# Altium PCB PCB_Adaptor_Board-v2.0.PcbDoc (part 3 of 3)
Units mm, origin at the board's own origin, x right, y up, seen from the top; angles counter-clockwise.
Board outline 135 x 88.7 mm, 2 copper layers (Top Layer, Bottom Layer), stack 1.57 mm thick; 43 components, 95 nets, 382 pads, 142 vias.
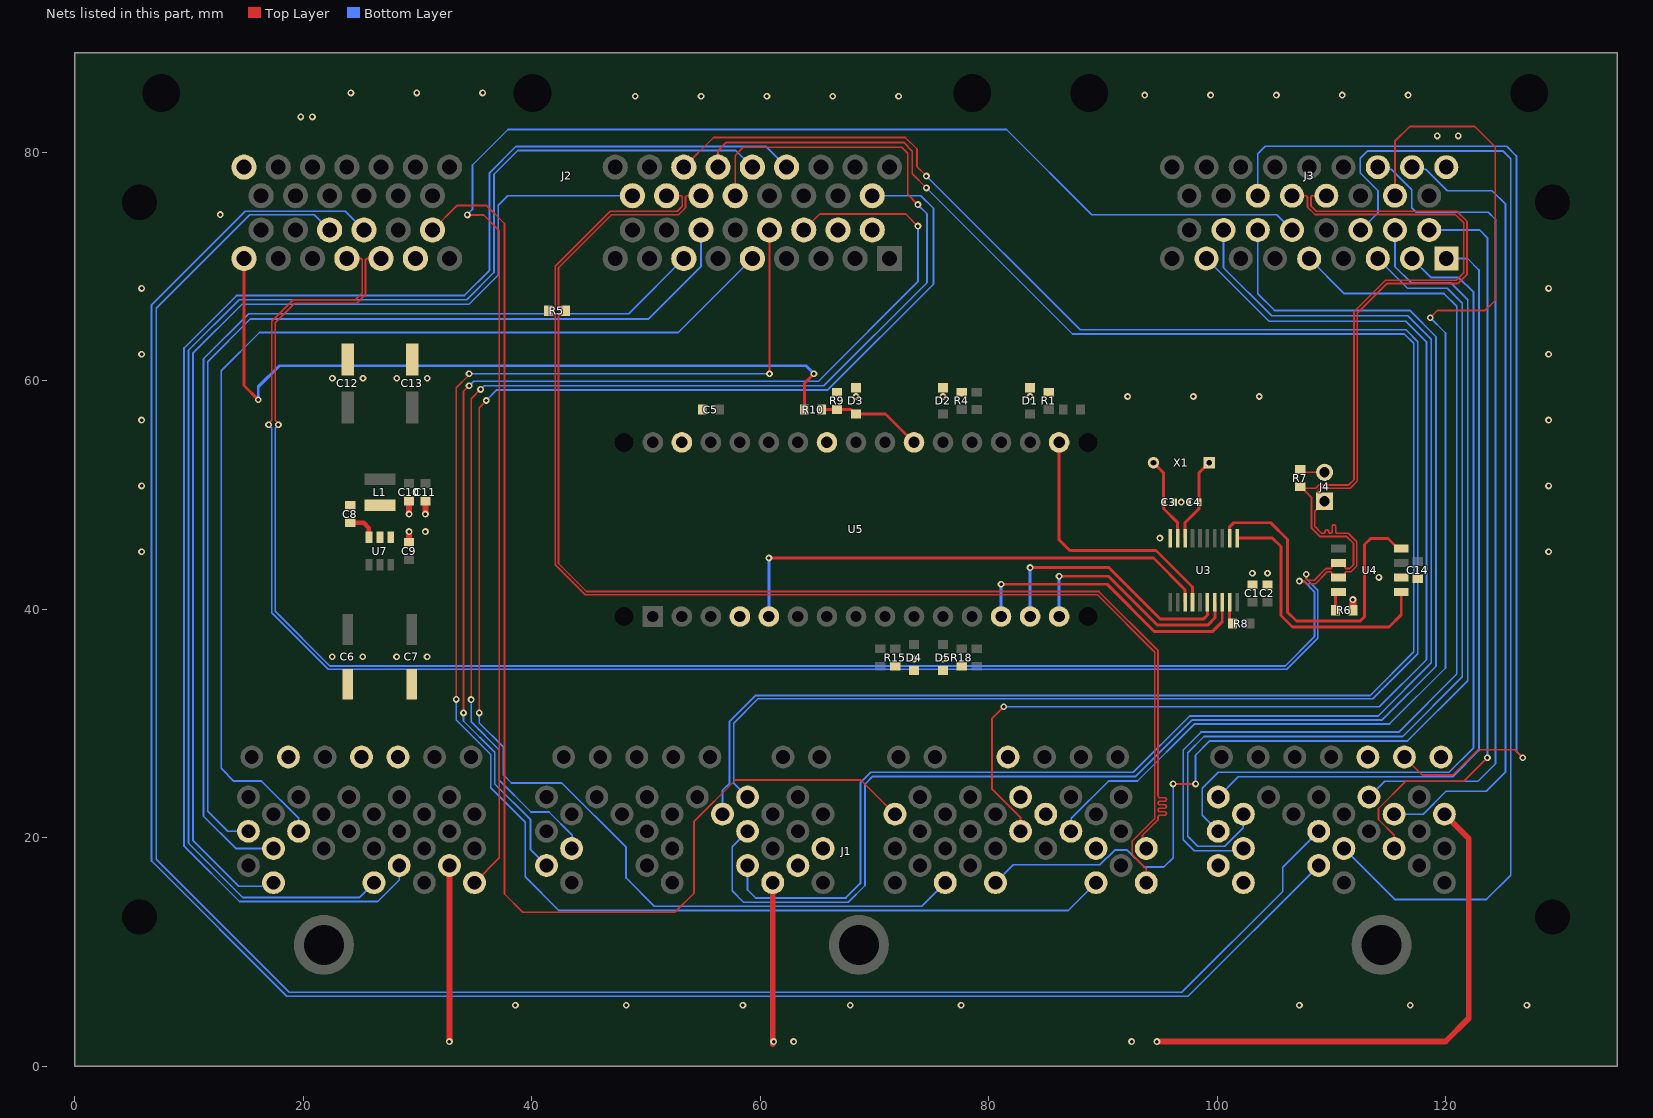
[diagram p2: the nets of this part, all layers, seen from the top]

## Via types
v1: diameter 0.6, hole 0.3, Top Layer to Bottom Layer, 142 vias

## Nets (pads, with @x,y where several pads share a name; then routed paths per layer and width w, separated by ;. In a path a pad name is that pad's centre, name@x,y a point inside that pad or via, vN(x,y) a via of type N, cw(c..) or ccw(c..) an arc to the next point about the centre after c; other vN are vias at no path point) (continued)
A25/A5: J1.A25 J2.A5 | length 95.1
  Bottom Layer w0.152: J1.A25@19.585,20.567 19.585,21.712 16.337,24.96 13.909,24.96 12.799,26.07 12.799,60.874 16.153,64.229 52.824,64.229 J2.A5@59.301,70.706
A26/A7: J1.A26 J2.A7 | length 93
  Bottom Layer w0.152: J1.A26@17.385,19.067 14.092,19.067 11.248,21.91 11.248,61.91 15.212,65.874 48.47,65.874 J2.A7@53.301,70.706
A27/A15: J1.A27 J2.A15 | length 93.5
  Bottom Layer w0.152: J1.A27@15.185,20.567 13.385,20.567 11.636,22.316 11.636,61.687 15.371,65.423 50.226,65.423 54.801,69.998 J2.A15@54.801,73.206
A28/B14: J1.A28 J3.B14 | length 142.6
  Top Layer w0.152: v1(34.351,74.522) 35.788,74.522 37.156,73.154 37.156,18.238 J1.A28@34.985,16.067
  Bottom Layer w0.152: v1(34.351,74.522) 34.351,74.548 34.807,75.005 34.807,78.893 37.913,81.999 81.552,81.999 89.016,74.535 105.222,74.535 J3.B14@106.551,73.206
A31/A29: J1.A31 J2.A29 | length 132.3
  Bottom Layer w0.152: J1.A31@28.385,17.567 28.385,16.305 26.498,14.418 14.407,14.418 9.557,19.267 9.557,62.875 14.154,67.472 34.093,67.472 36.301,69.679 36.301,78.213 38.611,80.523 60.483,80.523 J2.A29@62.301,78.706
A32/A30: J1.A32 J2.A30 | length 124.1
  Bottom Layer w0.152: J1.A32@26.185,16.067 24.883,14.765 14.715,14.765 9.933,19.547 9.933,62.652 14.37,67.09 34.285,67.09 36.678,69.482 36.678,78.067 38.775,80.164 57.843,80.164 J2.A30@59.301,78.706
A33/A25: J1.A33 J2.A25 | length 99.2
  Bottom Layer w0.152: J1.A33@17.385,16.067 17.07,15.752 14.346,15.752 10.33,19.767 10.33,62.416 14.622,66.708 34.501,66.708 37.061,69.268 37.061,75.362 37.904,76.206 J2.A25@48.801,76.206
AGND: J1.A29 J1.B29 J1.B30 J1.C10 J1.C11 J1.C19 J1.D8 J1.D30 J1.D31 J2.C26 J3.B26 | length 76.8
  Top Layer w0.508: v1(32.785,2.159) J1.A29@32.785,17.567 ; v1@61.085,1.933 61.085,2.159 J1.B30@61.085,16.067 ; J1.B29@63.011,17.293 J1.B29@63.285,17.567 ; v1(94.719,2.159) 119.977,2.159 122.022,4.203 122.022,19.93 J1.D8@119.885,22.067
  other v1: 61.163,2.159 62.916,2.159 92.498,2.159 119.261,81.438 121.101,81.438 19.768,83.101 20.781,83.101
B11/A32: J1.B11 J2.A32 | length 170.3
  Top Layer w0.152: J2.A32@53.301,78.706 55.899,81.304 72.699,81.304 73.712,80.291 73.712,78.758 v1(74.542,77.928)
  Bottom Layer w0.152: J1.B11@58.885,23.567 57.673,24.778 57.673,30.038 59.8,32.165 113.607,32.165 117.561,36.12 117.561,63.428 116.527,64.463 88.007,64.463 v1@74.543,77.927
B12/A31: J1.B12 J2.A31 | length 168.9
  Top Layer w0.152: J2.A31@56.301,78.706 56.301,80.15 57.023,80.872 72.544,80.872 73.304,80.111 73.304,78.123 v1(74.542,76.885)
  Bottom Layer w0.152: J1.B12@56.685,22.067 56.685,24.147 57.308,24.77 57.308,30.19 59.563,32.445 113.369,32.445 117.196,36.271 117.196,63.276 116.375,64.097 87.33,64.097 v1(74.542,76.885)
B23/B15: J1.B23 J3.B15 | length 133.1
  Bottom Layer w0.152: J1.B23@58.885,20.567 57.531,19.213 57.531,15.349 58.523,14.357 67.694,14.357 69.16,15.823 69.16,24.684 69.848,25.371 92.862,25.371 97.807,30.317 114.447,30.317 119.152,35.022 119.152,63.867 116.851,66.167 105.013,66.167 103.551,67.629 J3.B15@103.551,73.206
B26/A22: J1.B26 J2.A22 | length 119.3
  Top Layer w0.152: v1(34.685,32.097) 34.685,58.43 v1(35.507,59.252) ; J2.A22@57.801,76.206 57.801,79.726 58.516,80.442 72.382,80.442 72.895,79.929 72.895,76.328 v1(73.795,75.428)
  Bottom Layer w0.152: v1(34.685,32.097) 34.685,30.142 37.145,27.682 37.145,25.03 39.924,22.251 41.497,22.251 43.542,20.206 43.542,19.124 J1.B26@43.485,19.067 ; v1(35.507,59.252) 35.828,59.573 65.564,59.573 74.59,68.599 74.59,74.633 v1(73.795,75.428)
B31/B16: J1.B31 J3.B16 | length 128.4
  Bottom Layer w0.152: J1.B31@58.885,17.567 58.885,15.428 59.578,14.735 67.494,14.735 68.763,16.004 68.763,24.83 69.67,25.737 92.658,25.737 97.586,30.665 114.091,30.665 118.733,35.307 118.733,63.629 116.667,65.695 104.757,65.695 100.551,69.902 J3.B16@100.551,73.206
B35/A12: J1.B35 J2.A12 | length 104.2
  Top Layer w0.152: v1(34.015,30.927) 34.015,59.087 v1(34.501,59.573) ; J2.A12@63.801,73.206 65.197,74.601 72.737,74.601 v1(73.795,73.544)
  Bottom Layer w0.152: v1(34.015,30.927) 34.015,30.219 36.757,27.478 36.757,24.711 39.889,21.579 39.889,18.962 J1.B35@41.285,17.567 ; v1(34.501,59.573) 34.523,59.573 34.923,59.972 65.093,59.972 73.795,68.675 v1(73.795,73.544)
C16/C8: J1.C16 J2.C8 | length 111.1
  Top Layer w0.152: J2.C8@31.301,73.206 33.453,75.358 36.021,75.358 37.608,73.771 37.608,15.074 39.195,13.487 52.518,13.487 54.201,15.169 54.201,21.43 57.823,25.053 68.799,25.053 J1.C16@71.785,22.067
C20/B19: J1.C20 J3.B19 | length 105.2
  Top Layer w0.152: J3.B19@115.551,76.206 115.551,80.975 116.845,82.269 122.534,82.269 124.332,80.471 124.332,67.038 123.461,66.167 119.282,66.167 v1(118.641,65.526)
  Bottom Layer w0.152: J1.C20@87.185,20.567 87.23,20.611 87.23,21.706 90.489,24.966 93.016,24.966 98.019,29.969 115.082,29.969 119.976,34.863 119.976,64.191 v1(118.641,65.526)
C22/B8: J1.C22 J3.B8 | length 101.2
  Top Layer w0.152: v1(81.305,31.471) 80.289,30.455 80.289,24.256 82.785,21.761 J1.C22@82.785,20.567
  Bottom Layer w0.152: v1(81.305,31.471) 114.189,31.471 118.325,35.607 118.325,63.392 116.494,65.223 104.533,65.223 J3.B8@99.051,70.706
C30/A13: J1.C30 J2.A13 | length 138
  Top Layer w0.152: v1(33.376,32.111) 33.376,59.39 v1@34.501,60.515 ; v1(60.801,60.621) J2.A13@60.801,73.206
  Bottom Layer w0.152: v1(33.376,32.111) 33.376,30.313 36.396,27.292 36.396,24.387 39.418,21.366 39.418,16.583 42.363,13.637 86.955,13.637 J1.C30@89.385,16.067 ; v1(34.501,60.621) v1(60.801,60.621)
C31/B11: J1.C31 J3.B11 | length 99.3
  Top Layer w0.152: v1(96.139,24.714) 96.141,24.716 98.098,24.716 v1(98.1,24.719)
  Bottom Layer w0.152: J1.C31@80.585,16.067 82.15,17.632 89.729,17.632 91.016,18.919 92.111,18.919 93.593,17.437 95.308,17.437 96.139,18.267 v1(96.139,24.714) ; v1(98.1,24.719) 98.1,27.231 99.349,28.48 116.651,28.48 121.924,33.752 121.924,67.105 120.438,68.591 116.969,68.591 115.551,70.009 J3.B11@115.551,73.206
C33/A18: J1.C33 J2.A18 | length 135.6
  Top Layer w0.152: v1(35.392,30.927) 35.392,57.656 v1(36.012,58.276)
  Bottom Layer w0.152: v1(35.392,30.927) 35.392,30.051 37.523,27.92 37.523,25.491 38.218,24.795 42.617,24.795 48.247,19.165 48.247,16.483 50.726,14.005 74.123,14.005 J1.C33@76.185,16.067 ; v1(36.012,58.276) 36.942,59.206 65.904,59.206 75.156,68.458 75.156,75.102 74.052,76.206 J2.A18@69.801,76.206
CAN1_N: J2.C4 J3.B22 R7.2 U4.6 | length 207.1
  Top Layer w0.152: v1(16.96,56.159) 16.96,56.281 17.241,56.561 17.241,65.217 19.113,67.09 24.553,67.09 25.155,67.691 25.155,70.616 25.065,70.706 J2.C4@23.801,70.706 ; J3.B22@106.551,76.206 107.815,76.206 107.905,76.116 107.905,75.211 108.558,74.558 120.844,74.558 121.578,73.824 121.578,69.454 120.929,68.805 114.733,68.805 111.972,66.043 111.972,51.35 111.51,50.888 108.911,50.888 108.622,50.599 R7.2@107.453,50.599 ; R7.2@107.265,50.723 107.328,50.723 R7.2@107.453,50.599 ; v1(107.793,43.068) 107.816,43.046 107.816,42.648 107.925,42.54 108.477,42.54 109.511,43.574 109.947,43.574 110.036,43.663 110.036,43.789 110.31,44.063 U4.6@110.61,44.063 110.91,44.063 111.184,43.789 111.184,43.663 111.273,43.574 111.588,43.574 111.926,43.912 111.926,45.788 111.346,46.368 109.007,46.368 108.244,47.13 108.244,49.807 R7.2@107.453,50.599
  Bottom Layer w0.152: v1(16.96,56.159) 16.96,56.122 17.241,55.841 17.241,39.698 22.19,34.749 106.079,34.749 108.799,37.469 108.799,41.666 107.816,42.648 107.816,43.046 v1(107.793,43.068)
CAN1_P: J2.C3 J3.B21 J4.1 U4.7 | length 207.1
  Top Layer w0.152: v1(17.814,56.159) 17.814,56.281 17.533,56.561 17.533,65.096 19.234,66.798 24.674,66.798 25.447,67.57 25.447,70.616 25.536,70.706 J2.C3@26.801,70.706 ; v1(107.19,42.464) 107.212,42.442 107.61,42.442 107.804,42.248 108.598,42.248 109.632,43.282 109.947,43.282 110.036,43.193 110.036,43.067 110.31,42.793 U4.7@110.61,42.793 110.91,42.793 111.184,43.067 111.184,43.193 111.273,43.282 111.709,43.282 112.218,43.791 112.218,45.909 111.467,46.66 110.896,46.66 110.515,46.66 cw(c110.515,46.812) 110.363,46.812 110.363,47.24 ccw(c110.211,47.24) 110.058,47.24 110.058,46.812 cw(c109.906,46.812) 109.753,46.812 ccw(c109.601,46.812) 109.449,46.812 cw(c109.296,46.812) 109.296,46.66 109.127,46.66 108.613,47.174 108.536,47.251 108.536,48.592 J4.1@109.398,49.454 108.779,50.072 108.779,50.343 109.032,50.596 111.631,50.596 112.264,51.229 112.264,65.922 114.854,68.513 121.05,68.513 121.87,69.333 121.87,73.945 120.965,74.85 108.679,74.85 108.197,75.332 108.197,76.116 108.286,76.206 J3.B21@109.551,76.206
  Bottom Layer w0.152: v1(17.814,56.159) 17.814,56.122 17.533,55.841 17.533,39.819 22.311,35.041 105.958,35.041 108.507,37.59 108.507,41.545 107.61,42.442 107.212,42.442 v1(107.19,42.464)
CANHH_N: J1.C28 J2.A24 R5.2 | length 119.8
  Top Layer w0.152: J2.A24@51.801,76.206 53.065,76.206 53.155,76.116 53.155,75.282 52.716,74.843 46.855,74.843 42.043,70.031 42.043,66.231 41.954,66.142 R5.2@41.427,66.142 41.427,66.078 41.732,65.773 41.954,65.773 42.043,65.684 42.043,43.89 44.667,41.266 89.518,41.266 94.529,36.255 94.529,21.689 92.556,19.716 92.556,18.512 93.785,17.283 J1.C28@93.785,16.067
CANHH_P: J1.C17 J2.A23 R5.1 | length 119.8
  Top Layer w0.152: J2.A23@54.801,76.206 53.536,76.206 53.447,76.116 53.447,75.161 52.837,74.551 46.976,74.551 42.335,69.91 42.335,66.231 42.425,66.142 R5.1@42.951,66.142 42.951,66.078 42.647,65.773 42.425,65.773 42.335,65.684 42.335,44.011 44.788,41.558 89.639,41.558 94.821,36.376 94.821,23.966 94.821,23.652 ccw(c94.974,23.652) 94.974,23.5 95.398,23.5 cw(c95.398,23.347) 95.398,23.195 94.974,23.195 ccw(c94.974,23.042) 94.974,22.89 95.398,22.89 cw(c95.398,22.738) 95.398,22.585 94.974,22.585 ccw(c94.974,22.433) 94.974,22.28 95.398,22.28 cw(c95.398,22.128) 95.398,21.976 94.974,21.976 ccw(c94.974,21.823) 94.821,21.823 94.821,21.568 94.543,21.29 93.459,20.206 93.459,19.448 93.431,19.42 J1.C17@93.785,19.067
CS#: U3.18 U5.13 | length 26
  Top Layer w0.254: v1(81.073,42.189) 90.364,42.189 94.512,38.041 99.57,38.041 100.436,38.907 U3.18@100.436,40.628
  Bottom Layer w0.254: U5.13@81.073,39.37 v1(81.073,42.189)
D2/B23: J1.D2 J3.B23 | length 92.1
  Top Layer w0.152: J1.D2@116.385,27.067 117.952,25.499 120.626,25.499 122.831,27.704 126.042,27.704 v1(126.746,27)
  Bottom Layer w0.152: J3.B23@103.551,76.206 103.551,79.878 104.199,80.526 125.346,80.526 126.187,79.685 126.187,27.559 v1(126.746,27)
D10/B27: J1.D10 J3.B27 | length 70.5
  Bottom Layer w0.152: J1.D10@115.485,22.067 118.021,22.067 120.024,24.069 123.544,24.069 125.24,25.765 125.24,75.446 124.054,76.632 120.134,76.632 118.24,78.525 117.231,78.525 J3.B27@117.051,78.706
D11/B28: J1.D11 J3.B28 | length 73.1
  Bottom Layer w0.152: J1.D11@113.285,23.567 114.664,24.946 122.822,24.946 124.36,26.484 124.36,74.121 123.726,74.755 117.428,74.755 117.037,75.146 117.037,76.73 115.24,78.526 114.23,78.526 J3.B28@114.051,78.706
D16/B3: J1.D16 J3.B3 | length 82.9
  Bottom Layer w0.152: J1.D16@102.285,22.067 102.285,20.882 100.668,19.265 98.301,19.265 97.42,20.146 97.42,27.449 98.836,28.864 116.223,28.864 121.449,34.09 121.449,66.783 120.132,68.099 116.657,68.099 J3.B3@114.051,70.706
D17/B1: J1.D17 J3.B1 | length 69.8
  Bottom Layer w0.152: J1.D17@100.085,23.567 101.852,25.334 120.607,25.334 122.91,27.636 122.91,69.698 121.902,70.706 J3.B1@120.051,70.706
D20/B10: J1.D20 J3.B10 | length 66.3
  Top Layer w0.152: J1.D20@115.485,19.067 115.485,20.235 114.119,21.601 114.119,22.565 116.5,24.946 121.593,24.946 v1(123.647,27)
  Bottom Layer w0.152: J3.B10@118.551,73.206 122.979,73.206 123.647,72.538 v1(123.647,27)
D22/B12: J1.D22 J3.B12 | length 101.3
  Bottom Layer w0.152: J1.D22@111.085,19.067 115.548,14.603 123.569,14.603 125.69,16.724 125.69,79.437 124.998,80.129 113.184,80.129 112.527,79.472 112.527,78.192 114.068,76.651 114.068,74.723 J3.B12@112.551,73.206
D23/C11: J1.D23 J2.C11 | length 181
  Bottom Layer w0.152: J2.C11@22.301,73.206 20.966,74.541 15.309,74.541 7.12,66.351 7.12,18.124 18.775,6.469 96.908,6.469 105.738,15.299 105.738,17.42 J1.D23@108.885,20.567
D24/B5: J1.D24 J3.B5 | length 87.2
  Bottom Layer w0.152: J1.D24@102.285,19.067 102.079,18.861 97.97,18.861 97.017,19.814 97.017,27.688 98.579,29.25 115.872,29.25 120.962,34.34 120.962,66.528 119.854,67.637 111.12,67.637 J3.B5@108.051,70.706
D25/B2: J1.D25 J3.B2 | length 76
  Bottom Layer w0.152: J1.D25@100.085,20.567 98.683,21.969 98.683,24.333 100.085,25.735 120.288,25.735 122.439,27.885 122.439,67.746 121.148,69.037 118.719,69.037 J3.B2@117.051,70.706
D29/C10: J1.D29 J2.C10 | length 183.2
  Bottom Layer w0.152: J2.C10@25.301,73.206 23.651,74.855 14.918,74.855 6.708,66.645 6.708,17.966 18.553,6.122 97.44,6.122 J1.D29@108.885,17.567
D-4/C7_#A2: J2.C7 R10.1 | length 67.2
  Top Layer w0.254: J2.C7@14.801,70.706 14.801,59.595 v1(16.051,58.345) ; R10.1@63.855,57.487 63.855,59.783 v1(64.694,60.621)
  Bottom Layer w0.254: v1(16.051,58.345) 16.051,59.477 17.896,61.322 63.993,61.322 v1(64.694,60.621)
D-4/C7_A2: D3.1 R9.1 R10.2 U5.21 | length 9.4
  Top Layer w0.254: R10.2@65.227,57.487 R10.2@65.379,57.487 R9.1@66.722,57.487 67.935,57.487 68.323,57.099 D3.1@68.373,57.099 70.964,57.099 U5.21@73.453,54.61
GND: C1.1 C2.1 C3.1 C4.1 C5.2 C6.2 C7.2 C9.1 C10.1 C11.1 C12.2 C13.2 C14.1 D1.2 D2.2 D3.2 D4.2 D5.2 J1.A3 J1.A4 J1.A6 J1.B20 J1.C4 J1.D1 J1.D3 J2.A10 J2.A11 J2.C2 R1.2 R4.1 R6.2 R9.2 R15.2 R18.1 U3.10 U4.2 U5.4 U5.24 U5.29 U7.4 | length 4.2
  Top Layer w0.508: C9.1@29.25,45.862 v1(29.25,46.8) ; v1(29.25,48.336) C10.1@29.25,49.486 ; v1(30.683,48.336) C11.1@30.683,49.486
  Top Layer w0.635: R6.2@111.88,39.923 v1(111.88,40.85)
  other v1: 38.557,5.334 48.26,5.334 58.471,5.334 67.869,5.334 77.572,5.334 107.188,5.334 116.891,5.334 127.102,5.334 73.453,35.661 75.993,35.661 22.527,35.849 25.199,35.849 28.161,35.849 30.833,35.849 114.148,42.793 103.073,43.155 104.396,43.155 5.842,45.034 129.01,45.034 94.974,46.228 30.683,46.8 96.852,49.379 5.842,50.8 129.01,50.8 5.842,56.566 129.01,56.566 68.373,58.63 75.993,58.63 83.613,58.63 92.151,58.63 97.917,58.63 103.683,58.63 22.543,60.227 25.215,60.227 28.176,60.227 30.848,60.227 5.842,62.332 129.01,62.332 5.842,68.097 129.01,68.097 12.722,74.549 49.047,84.912 54.813,84.912 60.579,84.912 66.345,84.912 72.111,84.912 93.65,85.018 99.416,85.018 105.181,85.018 110.947,85.018 116.713,85.018 24.154,85.206 29.92,85.206 35.686,85.206
INT#: U3.13 U5.5 | length 43.8
  Top Layer w0.254: v1(60.753,44.491) 94.408,44.491 97.186,41.713 U3.13@97.186,40.628
  Bottom Layer w0.254: U5.5@60.753,39.37 v1(60.753,44.491)
MISO: U3.17 U5.15 | length 20.6
  Top Layer w0.254: v1(86.153,42.897) 90.473,42.897 94.76,38.61 99.162,38.61 99.786,39.234 U3.17@99.786,40.628
  Bottom Layer w0.254: U5.15@86.153,39.37 v1(86.153,42.897)
MOSI: U3.16 U5.14 | length 22.9
  Top Layer w0.254: v1(83.613,43.65) 90.509,43.65 94.991,39.168 98.811,39.168 99.136,39.493 U3.16@99.136,40.628
  Bottom Layer w0.254: U5.14@83.613,39.37 v1(83.613,43.65)
NetC8_1: C8.1 L1.1 U7.5
NetC8_2: C8.2 U7.6 | length 2.6
  Top Layer w0.381: C8.2@24.105,47.574 25.283,47.574 25.728,47.129 25.728,46.318 U7.6@25.745,46.3
NetJ4_2: J4.2 R7.1 | length 2.2
  Top Layer w0.152: R7.1@107.265,52.247 107.518,51.994 J4.2@109.398,51.994
NetR6_1: R6.1 U4.8 | length 1.7
  Top Layer w0.254: R6.1@110.356,39.923 110.356,41.3 110.579,41.523 U4.8@110.61,41.523
OSC1: C3.2 U3.9 X1.2 | length 7.5
  Top Layer w0.254: X1.2@94.412,52.832 95.292,51.952 C3.2@95.292,49.381 95.292,48.819 96.536,47.575 U3.9@96.536,46.228
OSC2: C4.2 U3.8 X1.1 | length 7.5
  Top Layer w0.254: U3.8@97.186,46.228 97.186,47.573 98.412,48.799 98.412,51.952 X1.1@99.292,52.832
RESET#: R8.1 U3.19 | length 2
  Top Layer w0.254: U3.19@101.086,40.628 101.086,38.998 R8.1@101.34,38.744
RXCAN: U3.2 U4.4 | length 30.5
  Top Layer w0.254: U3.2@101.086,46.228 101.086,47.223 101.442,47.579 104.675,47.579 106.152,46.102 106.152,39.747 106.93,38.969 112.518,38.969 112.892,39.343 112.892,45.662 113.438,46.207 114.936,46.207 115.81,45.333 U4.4@116.11,45.333
SCK: U3.14 U5.16 | length 23.2
  Top Layer w0.254: U5.16@86.153,54.61 86.153,46.091 87.093,45.151 94.628,45.151 97.836,41.943 U3.14@97.836,40.628
TXCAN: U3.1 U4.1 | length 23.6
  Top Layer w0.254: U3.1@101.736,46.228 104.844,46.228 105.579,45.493 105.579,39.47 106.591,38.458 115.039,38.458 116.11,39.529 U4.1@116.11,41.523
pads on no net: J1.A8 J1.A9 J1.A20 J1.A30 J1.B1 J1.B2 J1.B3 J1.B4 J1.B5 J1.B8 J1.B10 J1.B14 J1.B16 J1.B18 J1.B19 J1.B24 J1.B25 J1.B27 J1.B28 J1.B34 J1.C2 J1.C3 J1.C7 J1.C8 J1.C9 J1.C14 J1.C21 J1.C23 J1.C24 J1.C25 J1.C26 J1.C27 J1.C32 J1.C34 J1.C35 J1.D4 J1.D5 J1.D12 J1.D13 J1.D14 J1.D18 J1.D19 J1.D21 J1.D26 J1.D27 J1.D28 J1.MH1 J1.MH2 J1.MH3 J2. J2.A26 J3. J3.B4 J3.B9 J3.B24 J3.B29 J3.B30 J3.B31 J3.B32 J3.B33 J3.B34 U3.3 U3.4 U3.5 U3.6 U3.7 U3.11 U3.12 U3.15 U4.5 U5. U5.1 U5.2 U5.3 U5.6 U5.7 U5.8 U5.9 U5.12 U5.17 U5.18 U5.22 U5.23 U5.25 U5.26 U5.28 U5.30

## Polygon pours and split planes (outlines as drawn)
GND on Top Layer "GND_L01_P010" (solid, remove dead copper, pour order 10): 0,0 135,0 135,88.705 0,88.705
AGND on Top Layer "AGND_L01_P004" (solid, pour order 4): 103.59,10.693 103.59,0.711 81.407,0.711 81.407,25.095 90.755,25.095 90.755,4.115 98.683,4.115 98.683,18.567 103.59,18.567
5V_REG on Top Layer "5V_REG_L01_P002" (solid, pour order 2): 31.128,50.629 23.334,50.629 23.334,59.083 31.128,59.083
NetC8_1 on Top Layer "NETC8_1_L01_P001" (solid, pour order 1): 25.044,48.641 23.334,48.641 23.334,50.063 28.346,50.063 28.346,48.58 26.995,47.229 26.995,45.8 26.395,45.8 26.395,47.29
12V on Top Layer "12V_L01_P000" (solid, pour order 0): 13.204,16.217 13.204,42.697 26.395,42.697 26.395,44.719 28.806,44.719 30.492,44.719 30.492,36.89 19.075,36.89 19.075,31.598 23.368,31.598 23.368,26.067 20.625,26.067 20.625,29.312 16.678,29.312 16.678,16.217
GND on Bottom Layer "GND_L02_P009" (solid, remove dead copper, pour order 9): 0,0 135,0 135,88.705 0,88.705
5V_ECU on Bottom Layer "5V_ECU_L02_P008" (solid, pour order 8): 5.004,17.297 19.101,3.2 2.624,3.2 2.624,86.157 18.901,86.157 18.901,77.654 16.787,77.654 16.787,82.245 10.008,82.245 10.008,75.465 5.004,70.462
5V_ECU on Bottom Layer "5V_ECU_L02_P007" (solid, pour order 7): 31.785,23.067 31.785,12.903 38.05,12.903 38.05,21.737 36.72,23.067
5V_ECU on Bottom Layer "5V_ECU_L02_P006" (solid, pour order 6): 58.885,16.205 68.156,16.205 68.156,23.817 58.885,23.817
AGND on Bottom Layer "AGND_L02_P003" (solid, pour order 3): 118.821,81.051 121.717,81.051 121.717,88.494 0.254,88.494 0.254,0.432 95.377,0.432 95.377,2.819 2.21,2.819 2.21,86.538 15.977,86.538 118.821,86.538

## Other copper
Top Layer:
  rectangle net AGND: 14.128,77.928 15.579,83.74
  rectangle net AGND: 14.128,82.551 21.579,83.74
  rectangle net 5V_ECU: 34.595,3.231 36.703,14.224
  rectangle net 5V_ECU: 61.822,3.231 64.133,14.654
  rectangle net 5V_ECU: 61.822,13.637 67.999,14.654
  rectangle net 5V_ECU: 67.156,13.637 68.121,18.499
  rectangle net 5V_ECU: 66.286,17.173 67.843,18.004
  rectangle net 12V: 31.739,68.873 33.918,71.815
  rectangle net 12V: 99.11,25.806 101.658,34.215
  rectangle net 12V: 90.01,25.806 92.558,34.215
  rectangle net AGND: 60.666,15.359 63.933,16.808
  rectangle net AGND: 62.592,15.427 63.933,18.347
  rectangle net AGND: 32.512,0.711 98.683,2.972
  rectangle net AGND: 118.86,77.542 121.645,81.872
  rectangle net 5V_REG: 113.69,43.582 114.58,45.322
  rectangle net 5V_REG: 113.69,43.713 119.405,44.673
  rectangle net 12V: 41.51,25.806 44.058,34.215
  rectangle net GND: 51.994,53.467 54.305,57.932
  region net GND: 55.325,57.932 51.994,57.932 51.994,56.185 55.325,56.185
  rectangle net 5V_REG: 56.054,56.185 59.385,57.932
  rectangle net 5V_REG: 57.074,53.467 59.385,57.932
  rectangle net 5V_REG: 118.518,36.521 119.405,44.673
  rectangle net 5V_REG: 102.483,36.521 119.405,37.268
  rectangle net 5V_REG: 102.483,36.521 105.094,41.009
  rectangle net GND: 113.69,42.183 117.996,43.244
  rectangle net 5V_REG: 101.736,39.828 101.896,41.422
  rectangle net 5V_REG: 101.723,39.828 105.094,41.421
  pour cut-out: 29.642,44.983 31.75,44.983 31.486,44.719 26.395,44.719 26.395,42.956 23.413,42.956 23.413,44.902 23.489,44.978 31.128,44.978
Bottom Layer:
  rectangle net 5V_ECU: 2.592,3.155 125.73,4.558
  rectangle net AGND: 19.279,82.671 21.332,88.417
  rectangle net 5V_ECU: 66.852,26.029 76.426,28.067
  rectangle net 5V_ECU: 66.852,16.205 68.156,28.067
  rectangle net 5V_REG: 113.69,43.582 116.383,45.267
  rectangle net 5V_REG: 114.885,43.582 116.383,62.992
  rectangle net 5V_REG: 73.199,61.52 116.383,62.992
  rectangle net 5V_REG: 73.199,56.734 74.883,62.992
  rectangle net 5V_REG: 57.122,56.734 74.883,57.854
  rectangle net 5V_REG: 57.122,51.898 59.22,57.854
  rectangle net 5V_REG: 24.74,51.898 59.22,53.404
  rectangle net 5V_REG: 24.74,51.898 28.346,55.372
  rectangle net 12V: 17.501,33.029 19.075,37.077
  rectangle net 12V: 17.501,33.029 101.649,34.23

## Silkscreen, mask and mechanical layers (free items; w line width, h text height)
Dimension:
  circle w0.203: c129.349,75.641 r2.8
  circle w0.203: c129.349,13.063 r2.8
  circle w0.203: c5.651,13.063 r2.8
  circle w0.203: c5.651,75.641 r2.8
Board Outline:
  the board outline again, w0.762
Fabrication:
  drawing of 191 lines, arcs and shapes, not listed
  text "Layer" at 140.125,106.299 h1.52
  text "Name" at 150.537,106.299 h1.52
  text "Material" at 174.153,106.299 h1.52
  text "Thickness" at 195.991,106.299 h1.52
  text "Constant" at 212.496,106.299 h1.52
  text "Board Layer Stack" at 226.971,106.299 h1.52
  text "Top Overlay" at 150.537,103.251 h1.52
  text "Top Solder" at 150.537,100.203 h1.52
  text "Solder Resist" at 174.153,100.203 h1.52
  text "0.39mil" at 195.991,100.203 h1.52
  text "3.5" at 212.496,100.203 h1.52
  text "1" at 140.125,97.155 h1.52
  text "Top Layer" at 150.537,97.155 h1.52
  text "1.38mil" at 195.991,97.155 h1.52
  text "Dielectric 1" at 150.537,94.107 h1.52
  text "FR-4" at 174.153,94.107 h1.52
  text "59.06mil" at 195.991,94.107 h1.52
  text "4.8" at 212.496,94.107 h1.52
  text "2" at 140.125,91.059 h1.52
  text "Bottom Layer" at 150.537,91.059 h1.52
  text "1.38mil" at 195.991,91.059 h1.52
  text "Bottom Solder" at 150.537,88.011 h1.52
  text "Solder Resist" at 174.153,88.011 h1.52
  text "0.39mil" at 195.991,88.011 h1.52
  text "3.5" at 212.496,88.011 h1.52
  text "Bottom Overlay" at 150.537,84.963 h1.52
  text "Total board thickness:" at 140.125,81.915 h1.52
  text "62.60mil" at 195.991,81.915 h1.52
Mechanical 5:
  lines w0.064: -31.39,-28.26 ccw(c-31.359,-28.26) -31.327,-28.26 ; -31.359,-28.292 cw(c-31.359,-28.26) -31.359,-28.228
Drill Drawing:
  circle w0.254: c6.28,142.579 r0.508
  circle w0.254: c6.28,142.579 r0.847
  circle w0.254: c6.28,134.959 r0.847
  lines w0.254: 5.433,119.296 5.856,119.296 6.28,118.872 6.703,119.296 7.126,119.296 6.703,119.719 7.126,120.142 6.703,120.142 6.28,120.566 5.856,120.142 5.433,120.142 5.856,119.719 5.433,119.296 ; 5.433,122.682 7.126,122.682 7.126,124.376 5.433,124.376 5.433,122.682 ; 5.433,126.492 7.126,126.492 7.126,128.186 5.433,128.186 5.433,126.492 ; 5.433,131.996 7.126,131.996 6.28,130.302 5.433,131.996 ; 5.433,139.616 7.126,139.616 6.28,137.922 5.433,139.616 ; 5.433,145.542 5.433,145.966 5.856,146.389 5.433,146.812 5.433,147.236 5.856,147.236 6.28,146.812 6.703,147.236 7.126,147.236 7.126,146.812 6.703,146.389 7.126,145.966 7.126,145.542 6.703,145.542 6.28,145.966 5.856,145.542 5.433,145.542 ; 5.433,149.776 5.856,149.776 5.856,149.352 6.703,149.352 6.703,149.776 7.126,149.776 7.126,150.622 6.703,150.622 6.703,151.046 5.856,151.046 5.856,150.622 5.433,150.622 5.433,149.776 ; 5.433,154.009 6.28,153.162 7.126,154.009 6.28,154.856 5.433,154.009 ; 5.772,126.831 6.788,126.831 6.788,127.847 5.772,127.847 5.772,126.831 ; 5.772,131.657 6.788,131.657 6.28,130.641 5.772,131.657
  lines w0.381: 3.914,117.729 254.441,117.729 ; 3.914,155.829 254.441,155.829 ; 17.906,113.919 17.906,159.639 ; 32.889,113.919 32.889,159.639 ; 62.09,113.919 62.09,159.639 ; 74.939,113.919 74.939,159.639 ; 93.578,113.919 93.578,159.639 ; 131.666,113.919 131.666,159.639 ; 146.649,113.919 146.649,159.639 ; 165.592,113.919 165.592,159.639 ; 196.825,113.919 196.825,159.639 ; 218.815,113.919 218.815,159.639 ; 3.914,113.919 254.441,113.919 254.441,159.639 3.914,159.639 3.914,113.919
  text "Symbol" at 6.2,156.972 h1.83
  text "Count" at 19.049,156.972 h1.83
  text "Hole Size" at 34.032,156.972 h1.83
  text "Plated" at 63.233,156.972 h1.83
  text "Hole Type" at 76.082,156.972 h1.83
  text "Drill Layer Pair" at 94.721,156.972 h1.83
  text "Via/Pad" at 132.809,156.972 h1.83
  text "Pad Shape" at 147.792,156.972 h1.83
  text "Template" at 166.735,156.972 h1.83
  text "Hole Length" at 197.968,156.972 h1.83
  text "Routed Path Length" at 219.958,156.972 h1.83
  text "142" at 19.049,153.162 h1.52
  text "11.81mil (0.300mm)" at 34.032,153.162 h1.52
  text "PTH" at 63.233,153.162 h1.52
  text "Round" at 76.082,153.162 h1.52
  text "Top Layer - Bottom Layer" at 94.721,153.162 h1.52
  text "Via" at 132.809,153.162 h1.52
  text "Rounded" at 147.792,153.162 h1.52
  text "v60h30" at 166.735,153.162 h1.52
  text "-" at 197.968,153.162 h1.52
  text "-" at 219.958,153.162 h1.52
  text "2" at 19.049,149.352 h1.52
  text "19.69mil (0.500mm)" at 34.032,149.352 h1.52
  text "PTH" at 63.233,149.352 h1.52
  text "Round" at 76.082,149.352 h1.52
  text "Top Layer - Bottom Layer" at 94.721,149.352 h1.52
  text "Pad" at 132.809,149.352 h1.52
  text "(Mixed)" at 147.792,149.352 h1.52
  text "(Mixed)" at 166.735,149.352 h1.52
  text "-" at 197.968,149.352 h1.52
  text "-" at 219.958,149.352 h1.52
  text "2" at 19.049,145.542 h1.52
  text "35.43mil (0.900mm)" at 34.032,145.542 h1.52
  text "PTH" at 63.233,145.542 h1.52
  text "Round" at 76.082,145.542 h1.52
  text "Top Layer - Bottom Layer" at 94.721,145.542 h1.52
  text "Pad" at 132.809,145.542 h1.52
  text "(Mixed)" at 147.792,145.542 h1.52
  text "(Mixed)" at 166.735,145.542 h1.52
  text "-" at 197.968,145.542 h1.52
  text "-" at 219.958,145.542 h1.52
  text "30" at 19.049,141.732 h1.52
  text "39.37mil (1.000mm)" at 34.032,141.732 h1.52
  text "PTH" at 63.233,141.732 h1.52
  text "Round" at 76.082,141.732 h1.52
  text "Top Layer - Bottom Layer" at 94.721,141.732 h1.52
  text "Pad" at 132.809,141.732 h1.52
  text "(Mixed)" at 147.792,141.732 h1.52
  text "(Mixed)" at 166.735,141.732 h1.52
  text "-" at 197.968,141.732 h1.52
  text "-" at 219.958,141.732 h1.52
  text "135" at 19.049,137.922 h1.52
  text "47.64mil (1.210mm)" at 34.032,137.922 h1.52
  text "PTH" at 63.233,137.922 h1.52
  text "Round" at 76.082,137.922 h1.52
  text "Top Layer - Bottom Layer" at 94.721,137.922 h1.52
  text "Pad" at 132.809,137.922 h1.52
  text "Rounded" at 147.792,137.922 h1.52
  text "c200h121m200mx200p0" at 166.735,137.922 h1.52
  text "-" at 197.968,137.922 h1.52
  text "-" at 219.958,137.922 h1.52
  text "94" at 19.049,134.112 h1.52
  text "51.18mil (1.300mm)" at 34.032,134.112 h1.52
  text "PTH" at 63.233,134.112 h1.52
  text "Round" at 76.082,134.112 h1.52
  text "Top Layer - Bottom Layer" at 94.721,134.112 h1.52
  text "Pad" at 132.809,134.112 h1.52
  text "(Mixed)" at 147.792,134.112 h1.52
  text "(Mixed)" at 166.735,134.112 h1.52
  text "-" at 197.968,134.112 h1.52
  text "-" at 219.958,134.112 h1.52
  text "4" at 19.049,130.302 h1.52
  text "65.00mil (1.651mm)" at 34.032,130.302 h1.52
  text "NPTH" at 63.233,130.302 h1.52
  text "Round" at 76.082,130.302 h1.52
  text "Top Layer - Bottom Layer" at 94.721,130.302 h1.52
  text "Pad" at 132.809,130.302 h1.52
  text "Rounded" at 147.792,130.302 h1.52
  text "c0hn165" at 166.735,130.302 h1.52
  text "-" at 197.968,130.302 h1.52
  text "-" at 219.958,130.302 h1.52
  text "4" at 19.049,126.492 h1.52
  text "122.05mil (3.100mm)" at 34.032,126.492 h1.52
  text "NPTH" at 63.233,126.492 h1.52
  text "Round" at 76.082,126.492 h1.52
  text "Top Layer - Bottom Layer" at 94.721,126.492 h1.52
  text "Pad" at 132.809,126.492 h1.52
  text "Rounded" at 147.792,126.492 h1.52
  text "c0hn310" at 166.735,126.492 h1.52
  text "-" at 197.968,126.492 h1.52
  text "-" at 219.958,126.492 h1.52
  text "5" at 19.049,122.682 h1.52
  text "129.92mil (3.300mm)" at 34.032,122.682 h1.52
  text "NPTH" at 63.233,122.682 h1.52
  text "Round" at 76.082,122.682 h1.52
  text "Top Layer - Bottom Layer" at 94.721,122.682 h1.52
  text "Pad" at 132.809,122.682 h1.52
  text "Rounded" at 147.792,122.682 h1.52
  text "c0hn330" at 166.735,122.682 h1.52
  text "-" at 197.968,122.682 h1.52
  text "-" at 219.958,122.682 h1.52
  text "3" at 19.049,118.872 h1.52
  text "137.79mil (3.500mm)" at 34.032,118.872 h1.52
  text "PTH" at 63.233,118.872 h1.52
  text "Round" at 76.082,118.872 h1.52
  text "Top Layer - Bottom Layer" at 94.721,118.872 h1.52
  text "Pad" at 132.809,118.872 h1.52
  text "Rounded" at 147.792,118.872 h1.52
  text "c525h350m525mx525p0" at 166.735,118.872 h1.52
  text "-" at 197.968,118.872 h1.52
  text "-" at 219.958,118.872 h1.52
  text "421 Total" at 19.049,115.062 h1.52

## Dimensions
0,0 to 0,88.705 on Dimension
135,0 to 0,0 on Dimension

## Text inside footprints (layer, text, board x,y; h text height)
J1: Top Overlay "A1" at 36.185,26.559 h1; Top Overlay "B1" at 66.685,26.559 h1; Top Overlay "C1" at 92.785,26.559 h1; Top Overlay "D1" at 121.085,26.559 h1
J2: Top Overlay "A1" at 73.047,70.241 h1; Top Overlay "PCB Edge" at 67.79,87.401 h1 r180
J3: Top Overlay "PCB Edge" at 115.341,87.63 h1 r180